# Altium PCB STM32H743I-EVAL2PCBDESIGN.PcbDoc (part 7 of 23)
Units mil, origin at the board's own origin, x right, y up, seen from the top; angles counter-clockwise.
Board outline 6558 x 5417 mil, 8 copper layers (L1_TOP, L2_GND, L3_HS1, L4_POWER, L5_SIG, L6_HS2, L7_GND, L8_BOTTOM), stack 61.368 mil thick; 620 components, 588 nets, 2945 pads, 1724 vias.
Unrouted connection lines stored in the file: 1.
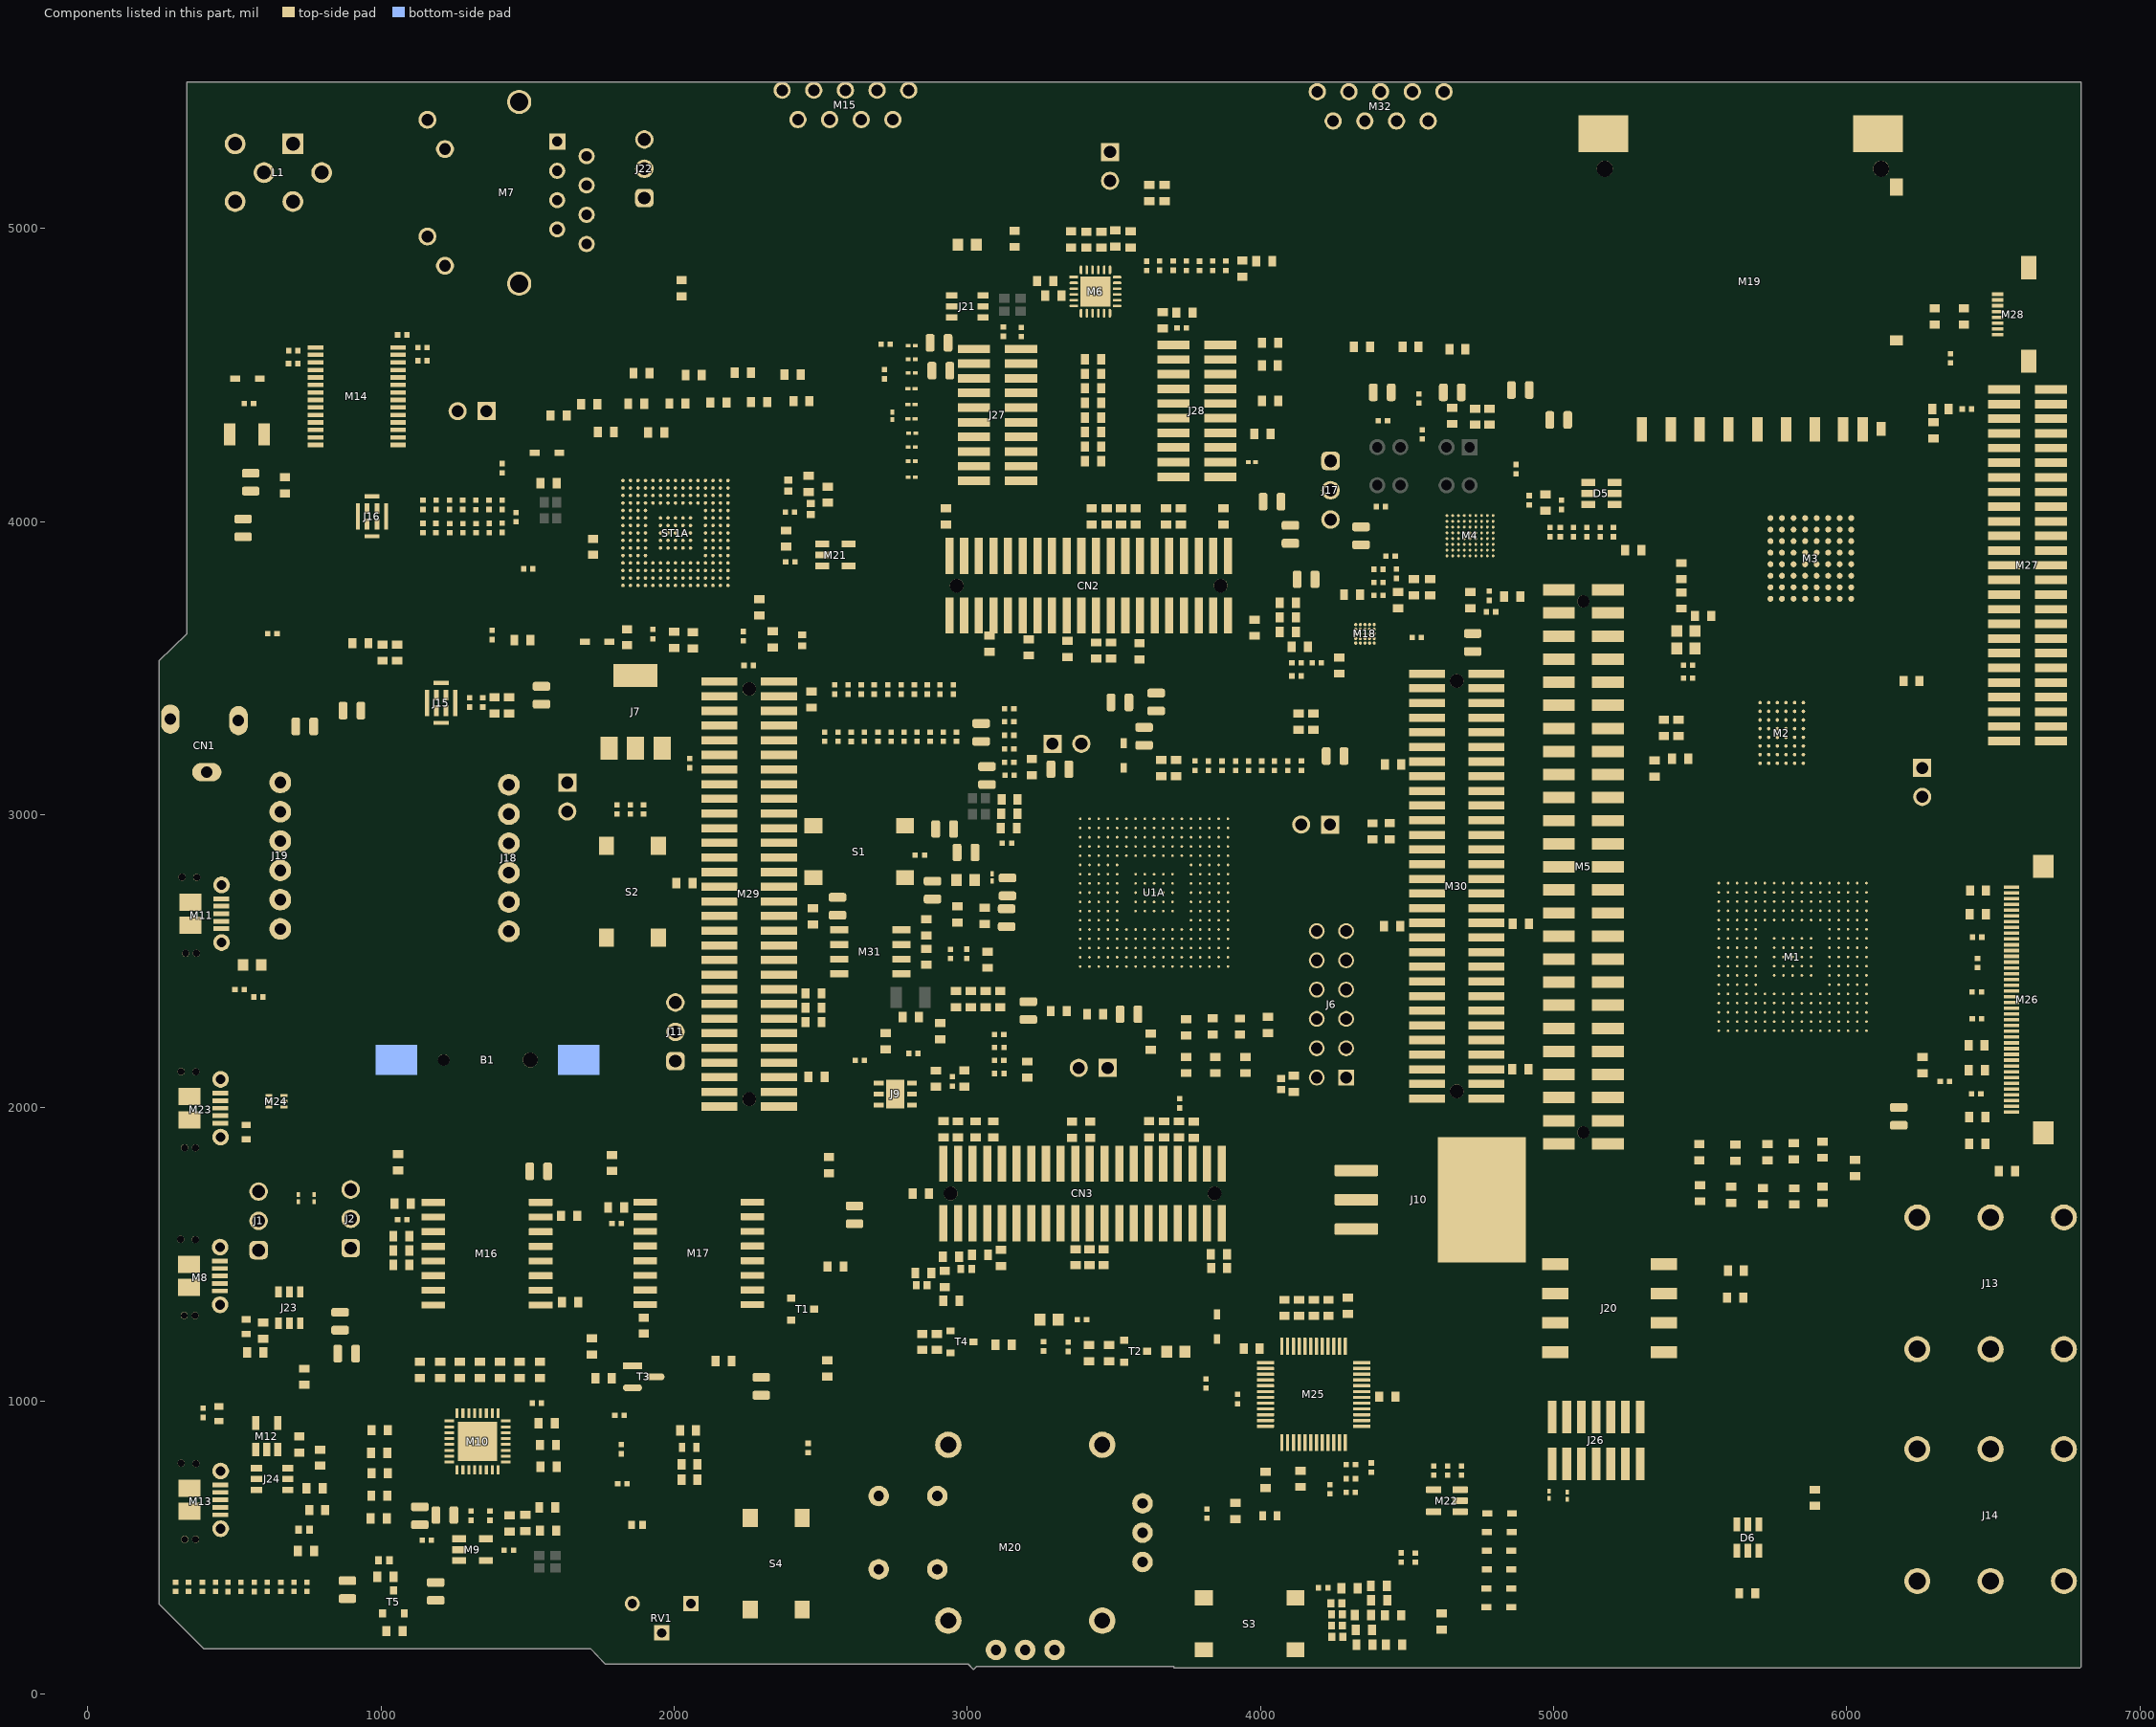
[diagram p8: the components of this part, seen from the top]

## Part data (continued)
M27: "CONN HEADER SMD 50POS 1.27MM / Connector Header Surface Mount 50 position 0.050\" (1.27mm)", Housing Color=Black, Manufacturer=Samtec, Manufacturer Lifecycle Status=PRODUCTION, Max Current Rating=1.75A, Max Operating Temperature=125°C, Min Operating Temperature=-55°C, Supplier Part Number=SAM9462-ND, Category="Headers and Wire Housings", ComponentLink1Description=https://sigma.octopart.com:443/97029548/technical_drawing/Samtec-FTSH-125-01-F-DV-K.pdf?src-supplier=Samtec, ComponentLink1URL=https://sigma.octopart.com:443/97029548/technical_drawing/Samtec-FTSH-125-01-F-DV-K.pdf?src-supplier=Samtec, ComponentLink2Description=https://datasheet.octopart.com:443/FTSH-125-01-F-DV-K-Samtec-datasheet-97029545.pdf?src-supplier=Samtec, ComponentLink2URL=https://datasheet.octopart.com:443/FTSH-125-01-F-DV-K-Samtec-datasheet-97029545.pdf?src-supplier=Samtec, ComponentLink3Description=https://datasheet.octopart.com:443/FTSH-125-01-F-DV-K-Samtec-datasheet-140825048.pdf?src-supplier=Electro+Sonic, ComponentLink3URL=https://datasheet.octopart.com:443/FTSH-125-01-F-DV-K-Samtec-datasheet-140825048.pdf?src-supplier=Electro+Sonic, ComponentLink4Description=https://datasheet.octopart.com:443/FTSH-125-01-F-DV-K-Samtec-datasheet-134102191.pdf?src-supplier=Electro+Sonic, ComponentLink4URL=https://datasheet.octopart.com:443/FTSH-125-01-F-DV-K-Samtec-datasheet-134102191.pdf?src-supplier=Electro+Sonic, ComponentLink5Description=https://datasheet.octopart.com:443/FTSH-125-01-F-DV-K-Samtec-datasheet-100454331.pdf?src-supplier=Newark, ComponentLink5URL=https://datasheet.octopart.com:443/FTSH-125-01-F-DV-K-Samtec-datasheet-100454331.pdf?src-supplier=Newark, ComponentLink6Description=https://datasheet.octopart.com:443/FTSH-125-01-F-DV-K-Samtec-datasheet-86818370.pdf?src-supplier=Sager+Electronics, ComponentLink6URL=https://datasheet.octopart.com:443/FTSH-125-01-F-DV-K-Samtec-datasheet-86818370.pdf?src-supplier=Sager+Electronics, ComponentLink7Description=https://datasheet.octopart.com:443/FTSH-125-01-F-DV-K-Samtec-datasheet-151470459.pdf?src-supplier=Sager+Electronics, ComponentLink7URL=https://datasheet.octopart.com:443/FTSH-125-01-F-DV-K-Samtec-datasheet-151470459.pdf?src-supplier=Sager+Electronics, ComponentLink8Description=https://datasheet.octopart.com:443/FTSH-125-01-F-DV-K-Samtec-datasheet-151470458.pdf?src-supplier=Sager+Electronics, ComponentLink8URL=https://datasheet.octopart.com:443/FTSH-125-01-F-DV-K-Samtec-datasheet-151470458.pdf?src-supplier=Sager+Electronics, ComponentLink9Description=https://datasheet.octopart.com:443/FTSH-125-01-F-DV-K-Samtec-datasheet-150877546.pdf?src-supplier=Sager+Electronics, ComponentLink9URL=https://datasheet.octopart.com:443/FTSH-125-01-F-DV-K-Samtec-datasheet-150877546.pdf?src-supplier=Sager+Electronics, ComponentLink10Description=https://datasheet.octopart.com:443/FTSH-125-01-F-DV-K-Samtec-datasheet-183475175.pdf?src-supplier=JRH+Electronics, ComponentLink10URL=https://datasheet.octopart.com:443/FTSH-125-01-F-DV-K-Samtec-datasheet-183475175.pdf?src-supplier=JRH+Electronics, ComponentLink11Description=https://datasheet.octopart.com:443/FTSH-125-01-F-DV-K-Samtec-datasheet-176663386.pdf?src-supplier=Toby+Electronics, ComponentLink11URL=https://datasheet.octopart.com:443/FTSH-125-01-F-DV-K-Samtec-datasheet-176663386.pdf?src-supplier=Toby+Electronics, ComponentLink12Description=https://datasheet.octopart.com:443/FTSH-125-01-F-DV-K-Samtec-datasheet-133497664.pdf?src-supplier=Toby+Electronics, ComponentLink12URL=https://datasheet.octopart.com:443/FTSH-125-01-F-DV-K-Samtec-datasheet-133497664.pdf?src-supplier=Toby+Electronics, ComponentLink13Description=https://datasheet.octopart.com:443/FTSH-125-01-F-DV-K-Samtec-datasheet-116535196.pdf?src-supplier=Toby+Electronics, ComponentLink13URL=https://datasheet.octopart.com:443/FTSH-125-01-F-DV-K-Samtec-datasheet-116535196.pdf?src-supplier=Toby+Electronics, ComponentLink14Description=https://datasheet.octopart.com:443/FTSH-125-01-F-DV-K-Samtec-datasheet-138897704.pdf?src-supplier=HQonline, ComponentLink14URL=https://datasheet.octopart.com:443/FTSH-125-01-F-DV-K-Samtec-datasheet-138897704.pdf?src-supplier=HQonline, Contact Material=Bronze, Contact Plating=Gold, Depth=3.43mm, Gender=Male, Housing Material=Polymer, Lead Free="Lead Free", Length=31.75mm, Lifecycle Status=Production, Manufacturer Part Number=FTSH-125-01-F-DV-K, Number of Contacts=50, Number of Rows=2, Orientation=Straight, Pitch=1.27mm, Pricing="1=5.71, 10=5.528, 25=5.35, 50=4.981, 100=4.113, 500=3.90376 (USD)", Radiation Hardening=No, RoHS=Compliant, Stock=154, Supplier=DigiKey, Termination=Solder
M28: "Molex 505110-0892 FFC & FPC Connectors, 0.5 FPC Zif Btm Cont Embt Pkg 8 Circuit,", Ambient Temperature Range High=105°C, Current Rating=500mA, Flammability Rating="UL94 V-0", Manufacturer=Molex, Manufacturer Lifecycle Status=ACTIVE, Min Operating Temperature=-40°C, Supplier Part Number=WM12364CT-ND, Voltage Rating=50V, Actuator Material="Glass, Nylon, Polyamide", Category="FFC / FPC", China RoHS=Compliant, ComponentLink1Description=https://sigma.octopart.com:443/165873393/technical_drawing/Molex-505110-0892.pdf?src-supplier=Upverter, ComponentLink1URL=https://sigma.octopart.com:443/165873393/technical_drawing/Molex-505110-0892.pdf?src-supplier=Upverter, ComponentLink2Description=https://datasheet.octopart.com:443/505110-0892-Molex-datasheet-165873386.pdf?src-supplier=Upverter, ComponentLink2URL=https://datasheet.octopart.com:443/505110-0892-Molex-datasheet-165873386.pdf?src-supplier=Upverter, ComponentLink3Description=https://datasheet.octopart.com:443/5051100892-Molex-datasheet-180775942.pdf?src-supplier=IHS, ComponentLink3URL=https://datasheet.octopart.com:443/5051100892-Molex-datasheet-180775942.pdf?src-supplier=IHS, ComponentLink4Description=https://datasheet.octopart.com:443/505110-0892-Molex-datasheet-193114841.pdf?src-supplier=JRH+Electronics, ComponentLink4URL=https://datasheet.octopart.com:443/505110-0892-Molex-datasheet-193114841.pdf?src-supplier=JRH+Electronics, ComponentLink5Description=https://datasheet.octopart.com:443/5051100892-Molex-datasheet-148171981.pdf?src-supplier=Molex, ComponentLink5URL=https://datasheet.octopart.com:443/5051100892-Molex-datasheet-148171981.pdf?src-supplier=Molex, ComponentLink6Description=https://datasheet.octopart.com:443/505110-0892-Molex-datasheet-77521067.pdf?src-supplier=element14+APAC, ComponentLink6URL=https://datasheet.octopart.com:443/505110-0892-Molex-datasheet-77521067.pdf?src-supplier=element14+APAC, ComponentLink7Description=https://datasheet.octopart.com:443/505110-0892-Molex-datasheet-62088043.pdf?src-supplier=Farnell, ComponentLink7URL=https://datasheet.octopart.com:443/505110-0892-Molex-datasheet-62088043.pdf?src-supplier=Farnell, ComponentLink8Description=https://datasheet.octopart.com:443/505110-0892-Molex-datasheet-140185858.pdf?src-supplier=RS+(Formerly+Allied+Electronics), ComponentLink8URL=https://datasheet.octopart.com:443/505110-0892-Molex-datasheet-140185858.pdf?src-supplier=RS+(Formerly+Allied+Electronics), ComponentLink9Description=https://datasheet.octopart.com:443/505110-0892-Molex-datasheet-120152440.pdf?src-supplier=RS+(Formerly+Allied+Electronics), ComponentLink9URL=https://datasheet.octopart.com:443/505110-0892-Molex-datasheet-120152440.pdf?src-supplier=RS+(Formerly+Allied+Electronics), ComponentLink10Description=https://datasheet.octopart.com:443/505110-0892-Molex-datasheet-61595454.pdf?src-supplier=RS+(Formerly+Allied+Electronics), ComponentLink10URL=https://datasheet.octopart.com:443/505110-0892-Molex-datasheet-61595454.pdf?src-supplier=RS+(Formerly+Allied+Electronics), ComponentLink11Description=https://datasheet.octopart.com:443/505110-0892-Molex-datasheet-134576216.pdf?src-supplier=TME, ComponentLink11URL=https://datasheet.octopart.com:443/505110-0892-Molex-datasheet-134576216.pdf?src-supplier=TME, ComponentLink12Description=http://sigma.octopart.com:80/reach_statement/Molex-company-74.pdf?src-supplier=Compliance+Statements, ComponentLink12URL=http://sigma.octopart.com:80/reach_statement/Molex-company-74.pdf?src-supplier=Compliance+Statements, ComponentLink13Description=http://sigma.octopart.com:80/rohs_statement/Molex-company-73.pdf?src-supplier=Compliance+Statements, ComponentLink13URL=http://sigma.octopart.com:80/rohs_statement/Molex-company-73.pdf?src-supplier=Compliance+Statements, ComponentLink14Description=http://sigma.octopart.com:80/conflict_mineral_statement/Molex-company-72.pdf?src-supplier=Compliance+Statements, ComponentLink14URL=http://sigma.octopart.com:80/conflict_mineral_statement/Molex-company-72.pdf?src-supplier=Compliance+Statements, Contact Material="Gold, Nickel", Contact Plating=Gold, Country of Origin=JP, Export Control Classification Number (ECCN) Code=EAR99, Gender=Female, Height=4.15mm, Introduction Date=2017-10-04, Lifecycle Status=Production, Manufacturer Part Number=505110-0892, Max Operating Temperature=105°C, Mounting Technology="Surface Mount", Number of Circuits=8, Number of Contacts=8, Number of Positions=8, Number of Rows=1, Orientation="Right Angle", Pins=8, Pitch=508µm, Plating=Gold, Pricing="1=0.68, 10=0.575, 25=0.5384, 50=0.5128, 100=0.4883, 250=0.45768, 500=0.4358, 1000=0.41498 (USD)", REACH SVHC=Yes, RoHS=Compliant, Schedule B=8536694040, Stock=8405, Supplier=DigiKey, Terminal Pitch=500µm, Termination=Solder
M29 M30: "Pin Header, Board-to-Board, 3.8 A, 2 Rows, 60 Contacts, Surface Mount, FTR Series, Unshrouded", Manufacturer=Samtec, Manufacturer Lifecycle Status=PRODUCTION, Supplier Part Number=FTR-130-03-L-D-LC-ND, Category="Board to Board Connectors", ComponentLink1Description=https://datasheet.octopart.com:443/FTR-130-03-L-D-LC-Samtec-datasheet-97028732.pdf?src-supplier=Samtec, ComponentLink1URL=https://datasheet.octopart.com:443/FTR-130-03-L-D-LC-Samtec-datasheet-97028732.pdf?src-supplier=Samtec, ComponentLink2Description=https://sigma.octopart.com:443/97028733/technical_drawing/Samtec-FTR-130-03-L-D-LC.pdf?src-supplier=Samtec, ComponentLink2URL=https://sigma.octopart.com:443/97028733/technical_drawing/Samtec-FTR-130-03-L-D-LC.pdf?src-supplier=Samtec, ComponentLink3Description=https://datasheet.octopart.com:443/FTR-130-03-L-D-LC-Samtec-datasheet-118235237.pdf?src-supplier=Electro+Sonic, ComponentLink3URL=https://datasheet.octopart.com:443/FTR-130-03-L-D-LC-Samtec-datasheet-118235237.pdf?src-supplier=Electro+Sonic, ComponentLink4Description=https://datasheet.octopart.com:443/FTR-130-03-L-D-LC-Samtec-datasheet-151312691.pdf?src-supplier=Sager+Electronics, ComponentLink4URL=https://datasheet.octopart.com:443/FTR-130-03-L-D-LC-Samtec-datasheet-151312691.pdf?src-supplier=Sager+Electronics, ComponentLink5Description=https://datasheet.octopart.com:443/FTR-130-03-L-D-LC-Samtec-datasheet-147834156.pdf?src-supplier=JRH+Electronics, ComponentLink5URL=https://datasheet.octopart.com:443/FTR-130-03-L-D-LC-Samtec-datasheet-147834156.pdf?src-supplier=JRH+Electronics, Lifecycle Status=Production, Manufacturer Part Number=FTR-130-03-L-D-LC, Pricing="15=11.85467 (USD)", RoHS=Compliant, Supplier=DigiKey
M31: "CAN 8Mbps Normal/Standby 2.5V/3.3V/5V Automotive AEC-Q100 8-Pin SOIC N T/R", Ambient Temperature Range High=150°C, Case/Package=SOIC, Manufacturer=Microchip, Manufacturer Lifecycle Status=REL, Manufacturer Package Identifier=C04-057-SN, Max Junction Temperature (Tj)=190°C, Max Supply Voltage=5.5V, Min Operating Temperature=-40°C, Min Supply Voltage=1.8V, Operating Supply Current=70mA, Supplier Part Number=150-MCP2562FDT-H/SNDKR-ND, Category="CAN Transceivers", ComponentLink1Description=https://datasheet.octopart.com:443/MCP2562FDT-H-SN-Microchip-datasheet-26699550.pdf?src-supplier=Microchip, ComponentLink1URL=https://datasheet.octopart.com:443/MCP2562FDT-H-SN-Microchip-datasheet-26699550.pdf?src-supplier=Microchip, ComponentLink2Description=https://datasheet.octopart.com:443/MCP2562FDT-H-SN-Microchip-datasheet-193545681.pdf?src-supplier=Microchip, ComponentLink2URL=https://datasheet.octopart.com:443/MCP2562FDT-H-SN-Microchip-datasheet-193545681.pdf?src-supplier=Microchip, ComponentLink3Description=https://sigma.octopart.com:443/164471516/technical_drawing/Microchip-MCP2562FDT-H-SN.pdf?src-supplier=Upverter, ComponentLink3URL=https://sigma.octopart.com:443/164471516/technical_drawing/Microchip-MCP2562FDT-H-SN.pdf?src-supplier=Upverter, ComponentLink4Description=http://sigma.octopart.com:80/188449173/materials_sheet/Microchip-MCP2562FDT-H-SN.pdf?src-supplier=Compliance+Statements, ComponentLink4URL=http://sigma.octopart.com:80/188449173/materials_sheet/Microchip-MCP2562FDT-H-SN.pdf?src-supplier=Compliance+Statements, ComponentLink5Description=http://sigma.octopart.com:80/190563418/materials_sheet/Microchip-MCP2562FDT-H-SN.pdf?src-supplier=Compliance+Statements, ComponentLink5URL=http://sigma.octopart.com:80/190563418/materials_sheet/Microchip-MCP2562FDT-H-SN.pdf?src-supplier=Compliance+Statements, ComponentLink6Description=http://sigma.octopart.com:80/rohs_statement/Microchip-company-71.pdf?src-supplier=Compliance+Statements, ComponentLink6URL=http://sigma.octopart.com:80/rohs_statement/Microchip-company-71.pdf?src-supplier=Compliance+Statements, ComponentLink7Description=http://sigma.octopart.com:80/reach_statement/Microchip-company-70.pdf?src-supplier=Compliance+Statements, ComponentLink7URL=http://sigma.octopart.com:80/reach_statement/Microchip-company-70.pdf?src-supplier=Compliance+Statements, ComponentLink8Description=http://sigma.octopart.com:80/conflict_mineral_statement/Microchip-company-69.pdf?src-supplier=Compliance+Statements, ComponentLink8URL=http://sigma.octopart.com:80/conflict_mineral_statement/Microchip-company-69.pdf?src-supplier=Compliance+Statements, ComponentLink9Description=http://sigma.octopart.com:80/conflict_mineral_statement/Microchip-company-68.pdf?src-supplier=Compliance+Statements, ComponentLink9URL=http://sigma.octopart.com:80/conflict_mineral_statement/Microchip-company-68.pdf?src-supplier=Compliance+Statements, Country of Assembly=Thailand, Country of Fabrication=Taiwan, Country of Origin=Thailand, Data Rate=8Mbps, Export Control Classification Number (ECCN) Code=EAR99, Harmonized Tariff Schedule (HTS) Code=8542.39.0060, Height=1.75mm, HS Code=8542.39.0090, Interface=CAN, Introduction Date=2014-03-24, Lifecycle Status=Production, Manufacturer Part Number=MCP2562FDT-H/SN, Max Operating Temperature=150°C, Mounting Technology="Surface Mount", Number of Channels=1, Number of Transceivers=1, Packaging="Tape & Reel (TR)", Pins=8, Pricing="1=1.38, 25=1.178 (USD)", Projected EOL Date=2039-03-24, Receiver Hysteresis=200mV, RoHS=Compliant, Schedule B="8529906000, 8529906000|8529906000|8529906000|8529906000|8529906000, 8542390000", Stock=6353, Supplier=DigiKey, Weight=540.001716mg
R1 R2 R139: library part RC0603FR-071K5L, "100mW Thick Film Resistors 75V ±100ppm/℃ ±1% 1.5kΩ 0603 Chip Resistor - Surface Mount ROHS", Case Code (Imperial)=0603, Manufacturer="Yageo Group", Max Operating Temperature=155°C, Max Power Dissipation=100mW, Min Operating Temperature=-55°C, Supplier Part Number=311-1.50KHRDKR-ND, Temperature Coefficient=100ppm/°C, Tolerance=1%, Voltage Rating=75V, Voltage Rating (AC)=50V, Case/Package=0603, Category="Chip SMD Resistors", China RoHS=Non-Compliant, ComponentLink1Description=https://datasheet.octopart.com:443/RC0603FR-071K5L-Yageo-datasheet-175887523.pdf?src-supplier=IHS, ComponentLink1URL=https://datasheet.octopart.com:443/RC0603FR-071K5L-Yageo-datasheet-175887523.pdf?src-supplier=IHS, ComponentLink2Description=https://datasheet.octopart.com:443/RC0603FR-071K5L-Yageo-datasheet-8328172.pdf?src-supplier=Newark, ComponentLink2URL=https://datasheet.octopart.com:443/RC0603FR-071K5L-Yageo-datasheet-8328172.pdf?src-supplier=Newark, ComponentLink3Description=https://datasheet.octopart.com:443/RC0603FR-071K5L-Yageo-datasheet-34211833.pdf?src-supplier=Newark, ComponentLink3URL=https://datasheet.octopart.com:443/RC0603FR-071K5L-Yageo-datasheet-34211833.pdf?src-supplier=Newark, ComponentLink4Description=https://datasheet.octopart.com:443/RC0603FR-071K5L-Yageo-datasheet-103092701.pdf?src-supplier=Upverter, ComponentLink4URL=https://datasheet.octopart.com:443/RC0603FR-071K5L-Yageo-datasheet-103092701.pdf?src-supplier=Upverter, ComponentLink5Description=https://datasheet.octopart.com:443/RC0603FR-071K5L-Yageo-Group-datasheet-190305687.pdf?src-supplier=Future+Electronics, ComponentLink5URL=https://datasheet.octopart.com:443/RC0603FR-071K5L-Yageo-Group-datasheet-190305687.pdf?src-supplier=Future+Electronics, ComponentLink6Description=https://datasheet.octopart.com:443/RC0603FR-071K5L-Yageo-datasheet-12596169.pdf?src-supplier=Future+Electronics, ComponentLink6URL=https://datasheet.octopart.com:443/RC0603FR-071K5L-Yageo-datasheet-12596169.pdf?src-supplier=Future+Electronics, ComponentLink7Description=https://datasheet.octopart.com:443/RC0603FR-071K5L-Yageo-datasheet-164759695.pdf?src-supplier=Future+Electronics, ComponentLink7URL=https://datasheet.octopart.com:443/RC0603FR-071K5L-Yageo-datasheet-164759695.pdf?src-supplier=Future+Electronics, ComponentLink8Description=https://datasheet.octopart.com:443/RC0603FR-071K5L-Yageo-datasheet-137700087.pdf?src-supplier=Future+Electronics, ComponentLink8URL=https://datasheet.octopart.com:443/RC0603FR-071K5L-Yageo-datasheet-137700087.pdf?src-supplier=Future+Electronics, ComponentLink9Description=https://datasheet.octopart.com:443/RC0603FR-071K5L-Yageo-datasheet-127823281.pdf?src-supplier=Future+Electronics, ComponentLink9URL=https://datasheet.octopart.com:443/RC0603FR-071K5L-Yageo-datasheet-127823281.pdf?src-supplier=Future+Electronics, ComponentLink10Description=https://datasheet.octopart.com:443/RC0603FR071K5L-Yageo-datasheet-27584510.pdf?src-supplier=Future+Electronics, ComponentLink10URL=https://datasheet.octopart.com:443/RC0603FR071K5L-Yageo-datasheet-27584510.pdf?src-supplier=Future+Electronics, ComponentLink11Description=https://datasheet.octopart.com:443/RC0603FR-071K5L-Yageo-datasheet-15599030.pdf?src-supplier=Future+Electronics, ComponentLink11URL=https://datasheet.octopart.com:443/RC0603FR-071K5L-Yageo-datasheet-15599030.pdf?src-supplier=Future+Electronics, ComponentLink12Description=https://datasheet.octopart.com:443/RC0603FR-071K5L-Yageo-datasheet-8324193.pdf?src-supplier=Future+Electronics, ComponentLink12URL=https://datasheet.octopart.com:443/RC0603FR-071K5L-Yageo-datasheet-8324193.pdf?src-supplier=Future+Electronics, ComponentLink13Description=https://datasheet.octopart.com:443/RC0603FR-071K5L-Yageo-datasheet-62067350.pdf?src-supplier=element14+APAC, ComponentLink13URL=https://datasheet.octopart.com:443/RC0603FR-071K5L-Yageo-datasheet-62067350.pdf?src-supplier=element14+APAC, ComponentLink14Description=https://datasheet.octopart.com:443/RC0603FR-071K5L-Yageo-Group-datasheet-189192902.pdf?src-supplier=LCSC, ComponentLink14URL=https://datasheet.octopart.com:443/RC0603FR-071K5L-Yageo-Group-datasheet-189192902.pdf?src-supplier=LCSC, ComponentLink15Description=https://datasheet.octopart.com:443/RC0603FR-071K5L-Yageo-datasheet-79472498.pdf?src-supplier=Megastar, ComponentLink15URL=https://datasheet.octopart.com:443/RC0603FR-071K5L-Yageo-datasheet-79472498.pdf?src-supplier=Megastar, ComponentLink16Description=https://datasheet.octopart.com/RC0603FR-071K5L-Yageo-datasheet-73766026.pdf, ComponentLink16URL=https://datasheet.octopart.com/RC0603FR-071K5L-Yageo-datasheet-73766026.pdf, ComponentLink17Description=https://datasheet.octopart.com:443/RC0603FR-071K5L-Yageo-datasheet-30459151.pdf?src-supplier=Seeed+Studio, ComponentLink17URL=https://datasheet.octopart.com:443/RC0603FR-071K5L-Yageo-datasheet-30459151.pdf?src-supplier=Seeed+Studio, ComponentLink18Description=https://datasheet.octopart.com:443/RC0603FR-071K5L-Yageo-datasheet-13691069.pdf?src-supplier=Farnell, ComponentLink18URL=https://datasheet.octopart.com:443/RC0603FR-071K5L-Yageo-datasheet-13691069.pdf?src-supplier=Farnell, ComponentLink19Description=https://datasheet.octopart.com:443/RC0603FR-071K5L-Yageo-datasheet-118562.pdf?src-supplier=DigiKey, ComponentLink19URL=https://datasheet.octopart.com:443/RC0603FR-071K5L-Yageo-datasheet-118562.pdf?src-supplier=DigiKey, ComponentLink20Description=http://sigma.octopart.com:80/conflict_mineral_statement/Yageo-company-3.pdf?src-supplier=Compliance+Statements, ComponentLink20URL=http://sigma.octopart.com:80/conflict_mineral_statement/Yageo-company-3.pdf?src-supplier=Compliance+Statements, ComponentLink21Description=http://sigma.octopart.com:80/rohs_statement/Yageo-company-2.pdf?src-supplier=Compliance+Statements, ComponentLink21URL=http://sigma.octopart.com:80/rohs_statement/Yageo-company-2.pdf?src-supplier=Compliance+Statements, Composition="Thick Film", Contact Plating=Tin, Depth=800µm, Features="Moisture Resistant", Height=450µm, Lead Free="Lead Free", Length=1.6mm, Lifecycle Status=Production, Manufacturer Part Number=RC0603FR-071K5L, Military Standard=Not, Mounting Technology="Surface Mount", Number of Terminals=2, Number of Terminations=2, Packaging="Tape & Reel", Pins=2, Power Rating=100mW, Pricing="1=0.11, 10=0.027, 25=0.0196, 50=0.0158, 100=0.0129, 250=0.00996, 500=0.0083, 1000=0.00701 (USD)", Radiation Hardening=No, REACH SVHC=Yes, RoHS=Compliant, Schedule B="8533210045, 8533210045|8533210045|8533210045|8533210045|8533210045|8533210045|8533210045|8533210045|8533210045|8533210045|8533210045|8533210045|8533210045|8533210045|8533210045|8533210045|8533210045|8533210045|8533210045|8533210045|8533210045|8533210045|8533210045|85", Stock=1165040, Supplier=DigiKey, Termination=SMD/SMT, Voltage Rating (DC)=50V, Width=800µm, Working Voltage=75V
R3 R4 R5 R23 R90 R93 R101 R103 R106 R107 R108 R109 R121 R123 R127 R128 R129 R136 R143 R145 R150 R175 R177 R185 R197 R198 R199 R200 R201 R202 R203 R205 R225 R232 R233 R239 R258 R259 R260 R265: library part RC0603FR-0710KL, "100mW Thick Film Resistors ±100ppm/℃ ±1% 10kΩ 0603 Chip Resistor - Surface Mount ROHS", Case Code (Imperial)=0603, Manufacturer="Yageo Group", Max Operating Temperature=155°C, Min Operating Temperature=-55°C, Power Rating=100mW, Supplier Part Number=311-10.0KHRDKR-ND, Temperature Coefficient=100ppm/°C, Tolerance=1%, Voltage Rating=75V, Voltage Rating (DC)=50V, Case Code (Metric)=0603, Case/Package=0603, Category="Chip SMD Resistors", China RoHS=Non-Compliant, ComponentLink1Description=https://datasheet.octopart.com:443/RC0603FR-0710KL-Yageo-datasheet-175887523.pdf?src-supplier=IHS, ComponentLink1URL=https://datasheet.octopart.com:443/RC0603FR-0710KL-Yageo-datasheet-175887523.pdf?src-supplier=IHS, ComponentLink2Description=https://datasheet.octopart.com:443/RC0603FR-0710KL-Yageo-datasheet-103092701.pdf?src-supplier=Upverter, ComponentLink2URL=https://datasheet.octopart.com:443/RC0603FR-0710KL-Yageo-datasheet-103092701.pdf?src-supplier=Upverter, ComponentLink3Description=https://datasheet.octopart.com:443/RC0603FR-0710KL-Yageo-datasheet-98239111.pdf?src-supplier=Upverter, ComponentLink3URL=https://datasheet.octopart.com:443/RC0603FR-0710KL-Yageo-datasheet-98239111.pdf?src-supplier=Upverter, ComponentLink4Description=https://datasheet.octopart.com:443/RC0603FR-0710KL-Yageo-datasheet-141265859.pdf?src-supplier=Upverter, ComponentLink4URL=https://datasheet.octopart.com:443/RC0603FR-0710KL-Yageo-datasheet-141265859.pdf?src-supplier=Upverter, ComponentLink5Description=https://sigma.octopart.com:443/138820526/technical_drawing/Yageo-RC0603FR-0710KL.pdf?src-supplier=Upverter, ComponentLink5URL=https://sigma.octopart.com:443/138820526/technical_drawing/Yageo-RC0603FR-0710KL.pdf?src-supplier=Upverter, ComponentLink6Description=https://datasheet.octopart.com:443/RC0603FR-0710KL-Yageo-datasheet-8328172.pdf?src-supplier=Farnell, ComponentLink6URL=https://datasheet.octopart.com:443/RC0603FR-0710KL-Yageo-datasheet-8328172.pdf?src-supplier=Farnell, ComponentLink7Description=https://datasheet.octopart.com:443/RC0603FR-0710KL-Yageo-datasheet-13691069.pdf?src-supplier=Farnell, ComponentLink7URL=https://datasheet.octopart.com:443/RC0603FR-0710KL-Yageo-datasheet-13691069.pdf?src-supplier=Farnell, ComponentLink8Description=https://datasheet.octopart.com:443/RC0603FR-0710KL-Yageo-datasheet-62067350.pdf?src-supplier=element14+APAC, ComponentLink8URL=https://datasheet.octopart.com:443/RC0603FR-0710KL-Yageo-datasheet-62067350.pdf?src-supplier=element14+APAC, ComponentLink9Description=https://datasheet.octopart.com:443/RC0603FR-0710KL-Yageo-datasheet-17842380.pdf?src-supplier=element14+APAC, ComponentLink9URL=https://datasheet.octopart.com:443/RC0603FR-0710KL-Yageo-datasheet-17842380.pdf?src-supplier=element14+APAC, ComponentLink10Description=https://datasheet.octopart.com:443/RC0603FR-0710KL-Yageo-datasheet-15599030.pdf?src-supplier=Future+Electronics, ComponentLink10URL=https://datasheet.octopart.com:443/RC0603FR-0710KL-Yageo-datasheet-15599030.pdf?src-supplier=Future+Electronics, ComponentLink11Description=https://datasheet.octopart.com:443/RC0603FR-0710KL-Yageo-Group-datasheet-176638170.pdf?src-supplier=Future+Electronics, ComponentLink11URL=https://datasheet.octopart.com:443/RC0603FR-0710KL-Yageo-Group-datasheet-176638170.pdf?src-supplier=Future+Electronics, ComponentLink12Description=https://datasheet.octopart.com:443/RC0603FR-0710KL-Yageo-datasheet-164759695.pdf?src-supplier=Future+Electronics, ComponentLink12URL=https://datasheet.octopart.com:443/RC0603FR-0710KL-Yageo-datasheet-164759695.pdf?src-supplier=Future+Electronics, ComponentLink13Description=https://datasheet.octopart.com:443/RC0603FR-0710KL-Yageo-datasheet-127823281.pdf?src-supplier=Future+Electronics, ComponentLink13URL=https://datasheet.octopart.com:443/RC0603FR-0710KL-Yageo-datasheet-127823281.pdf?src-supplier=Future+Electronics, ComponentLink14Description=https://datasheet.octopart.com:443/RC0603FR-0710KL-Yageo-datasheet-137700087.pdf?src-supplier=Future+Electronics, ComponentLink14URL=https://datasheet.octopart.com:443/RC0603FR-0710KL-Yageo-datasheet-137700087.pdf?src-supplier=Future+Electronics, ComponentLink15Description=https://datasheet.octopart.com:443/RC0603FR-0710KL-Yageo-datasheet-27584510.pdf?src-supplier=Future+Electronics, ComponentLink15URL=https://datasheet.octopart.com:443/RC0603FR-0710KL-Yageo-datasheet-27584510.pdf?src-supplier=Future+Electronics, ComponentLink16Description=https://datasheet.octopart.com:443/RC0603FR-0710KL-Yageo-datasheet-8324193.pdf?src-supplier=Future+Electronics, ComponentLink16URL=https://datasheet.octopart.com:443/RC0603FR-0710KL-Yageo-datasheet-8324193.pdf?src-supplier=Future+Electronics, ComponentLink17Description=https://datasheet.octopart.com:443/RC0603FR-0710KL-Yageo-datasheet-12596169.pdf?src-supplier=Newark, ComponentLink17URL=https://datasheet.octopart.com:443/RC0603FR-0710KL-Yageo-datasheet-12596169.pdf?src-supplier=Newark, ComponentLink18Description=https://datasheet.octopart.com:443/RC0603FR-0710KL-Yageo-datasheet-503470.pdf?src-supplier=Newark, ComponentLink18URL=https://datasheet.octopart.com:443/RC0603FR-0710KL-Yageo-datasheet-503470.pdf?src-supplier=Newark, ComponentLink19Description=https://datasheet.octopart.com:443/RC0603FR-0710KL-Yageo-datasheet-34211833.pdf?src-supplier=Newark, ComponentLink19URL=https://datasheet.octopart.com:443/RC0603FR-0710KL-Yageo-datasheet-34211833.pdf?src-supplier=Newark, ComponentLink20Description=https://datasheet.octopart.com:443/RC0603FR-0710KL-Yageo-Group-datasheet-189192902.pdf?src-supplier=LCSC, ComponentLink20URL=https://datasheet.octopart.com:443/RC0603FR-0710KL-Yageo-Group-datasheet-189192902.pdf?src-supplier=LCSC, ComponentLink21Description=https://datasheet.octopart.com:443/RC0603FR-0710KL-Yageo-datasheet-79472498.pdf?src-supplier=Megastar, ComponentLink21URL=https://datasheet.octopart.com:443/RC0603FR-0710KL-Yageo-datasheet-79472498.pdf?src-supplier=Megastar, ComponentLink22Description=https://datasheet.octopart.com/RC0603FR-0710KL-Yageo-datasheet-73766026.pdf, ComponentLink22URL=https://datasheet.octopart.com/RC0603FR-0710KL-Yageo-datasheet-73766026.pdf, ComponentLink23Description=https://datasheet.octopart.com:443/RC0603FR-0710KL-Yageo-datasheet-118562.pdf?src-supplier=DigiKey, ComponentLink23URL=https://datasheet.octopart.com:443/RC0603FR-0710KL-Yageo-datasheet-118562.pdf?src-supplier=DigiKey, ComponentLink24Description=http://sigma.octopart.com:80/conflict_mineral_statement/Yageo-company-3.pdf?src-supplier=Compliance+Statements, ComponentLink24URL=http://sigma.octopart.com:80/conflict_mineral_statement/Yageo-company-3.pdf?src-supplier=Compliance+Statements, ComponentLink25Description=http://sigma.octopart.com:80/rohs_statement/Yageo-company-2.pdf?src-supplier=Compliance+Statements, ComponentLink25URL=http://sigma.octopart.com:80/rohs_statement/Yageo-company-2.pdf?src-supplier=Compliance+Statements, Composition="Thick Film", Contact Plating=Tin, Depth=800µm, Height=450µm, Lead Free="Lead Free", Lead Pitch=300µm, Length=1.6mm, Lifecycle Status=Production, Manufacturer Part Number=RC0603FR-0710KL, Military Standard=Not, Mounting Technology="Surface Mount", Number of Terminals=2, Packaging="Tape & Reel", Pins=2, Pricing="1=0.1, 10=0.025, 25=0.0188, 50=0.015, 100=0.0122, 250=0.0094, 500=0.00782, 1000=0.00661 (USD)", Radiation Hardening=No, REACH SVHC=Yes, RoHS=Compliant, Schedule B="8533210045, 8533210045|8533210045|8533210045|8533210045|8533210045|8533210045|8533210045|8533210045|8533210045|8533210045|8533210045|8533210045|8533210045|8533210045|8533210045|8533210045|8533210045|8533210045|8533210045|8533210045|8533210045|8533210045|8533210045|85", Stock=778832, Supplier=DigiKey, Termination=SMD/SMT, Weight=2.012816mg, Width=800µm, Working Voltage=75V
R6 R7 R8 R9 R10 R11 R12 R13 R14 R15 R16 R17 R18 R19 R20 R21 R22 R24 R25 R26 R27 R28 R29 R30 R31 R32 R33 R35 R36 R38 R39 R40 R41 R42 R43 R44 R45 R46 R47 R48 R49 R50 R51 R52 R53 R54 R55 R56 R57 R58 R59 R60 R61 R62 R63 R64 R65 R66 R68 R69 R71 R73 R74 R75 R76 R77 R79 R80 R81 R83 R84 R85 R86 R87 R89 R92: library part RC0402JR-0733RL, "Res Thick Film 0402 33 Ohm 5% 0.063W(1/16W) ±100ppm/C Pad SMD T/R", Case Code (Imperial)=0402, Manufacturer="Yageo Group", Max Operating Temperature=155°C, Max Power Dissipation=63mW, Min Operating Temperature=-55°C, Power Rating=62.5mW, Supplier Part Number=311-33JRCT-ND, Temperature Coefficient=100ppm/°C, Tolerance=5%, Voltage Rating=50V, Case/Package=0402, Category="Chip SMD Resistors", China RoHS=Non-Compliant, ComponentLink1Description=https://datasheet.octopart.com:443/RC0402JR-0733RL-Yageo-datasheet-175887523.pdf?src-supplier=Newark, ComponentLink1URL=https://datasheet.octopart.com:443/RC0402JR-0733RL-Yageo-datasheet-175887523.pdf?src-supplier=Newark, ComponentLink2Description=https://datasheet.octopart.com:443/RC0402JR-0733RL-Yageo-datasheet-10408619.pdf?src-supplier=Newark, ComponentLink2URL=https://datasheet.octopart.com:443/RC0402JR-0733RL-Yageo-datasheet-10408619.pdf?src-supplier=Newark, ComponentLink3Description=https://datasheet.octopart.com:443/RC0402JR-0733RL-Yageo-datasheet-8324527.pdf?src-supplier=Newark, ComponentLink3URL=https://datasheet.octopart.com:443/RC0402JR-0733RL-Yageo-datasheet-8324527.pdf?src-supplier=Newark, ComponentLink4Description=https://datasheet.octopart.com:443/RC0402JR-0733RL-Yageo-datasheet-141265859.pdf?src-supplier=Upverter, ComponentLink4URL=https://datasheet.octopart.com:443/RC0402JR-0733RL-Yageo-datasheet-141265859.pdf?src-supplier=Upverter, ComponentLink5Description=https://sigma.octopart.com:443/138820526/technical_drawing/Yageo-RC0402JR-0733RL.pdf?src-supplier=Upverter, ComponentLink5URL=https://sigma.octopart.com:443/138820526/technical_drawing/Yageo-RC0402JR-0733RL.pdf?src-supplier=Upverter, ComponentLink6Description=https://datasheet.octopart.com:443/RC0402JR-0733RL-Yageo-datasheet-62067350.pdf?src-supplier=element14+APAC, ComponentLink6URL=https://datasheet.octopart.com:443/RC0402JR-0733RL-Yageo-datasheet-62067350.pdf?src-supplier=element14+APAC, ComponentLink7Description=https://datasheet.octopart.com:443/RC0402JR-0733RL-Yageo-Group-datasheet-189192902.pdf?src-supplier=LCSC, ComponentLink7URL=https://datasheet.octopart.com:443/RC0402JR-0733RL-Yageo-Group-datasheet-189192902.pdf?src-supplier=LCSC, ComponentLink8Description=https://datasheet.octopart.com:443/RC0402JR-0733RL-Yageo-Group-datasheet-176638170.pdf?src-supplier=Future+Electronics, ComponentLink8URL=https://datasheet.octopart.com:443/RC0402JR-0733RL-Yageo-Group-datasheet-176638170.pdf?src-supplier=Future+Electronics, ComponentLink9Description=https://datasheet.octopart.com:443/RC0402JR-0733RL-Yageo-datasheet-164759695.pdf?src-supplier=Future+Electronics, ComponentLink9URL=https://datasheet.octopart.com:443/RC0402JR-0733RL-Yageo-datasheet-164759695.pdf?src-supplier=Future+Electronics, ComponentLink10Description=https://datasheet.octopart.com:443/RC0402JR-0733RL-Yageo-datasheet-127823281.pdf?src-supplier=Future+Electronics, ComponentLink10URL=https://datasheet.octopart.com:443/RC0402JR-0733RL-Yageo-datasheet-127823281.pdf?src-supplier=Future+Electronics, ComponentLink11Description=https://datasheet.octopart.com:443/RC0402JR-0733RL-Yageo-datasheet-137700087.pdf?src-supplier=Future+Electronics, ComponentLink11URL=https://datasheet.octopart.com:443/RC0402JR-0733RL-Yageo-datasheet-137700087.pdf?src-supplier=Future+Electronics, ComponentLink12Description=https://datasheet.octopart.com:443/RC0402JR-0733RL-Yageo-datasheet-103092701.pdf?src-supplier=Future+Electronics, ComponentLink12URL=https://datasheet.octopart.com:443/RC0402JR-0733RL-Yageo-datasheet-103092701.pdf?src-supplier=Future+Electronics, ComponentLink13Description=https://datasheet.octopart.com:443/RC0402JR-0733RL-Yageo-datasheet-98239111.pdf?src-supplier=Future+Electronics, ComponentLink13URL=https://datasheet.octopart.com:443/RC0402JR-0733RL-Yageo-datasheet-98239111.pdf?src-supplier=Future+Electronics, ComponentLink14Description=https://datasheet.octopart.com:443/RC0402JR-0733RL-Yageo-datasheet-77992522.pdf?src-supplier=Future+Electronics, ComponentLink14URL=https://datasheet.octopart.com:443/RC0402JR-0733RL-Yageo-datasheet-77992522.pdf?src-supplier=Future+Electronics, ComponentLink15Description=https://datasheet.octopart.com:443/RC0402JR-0733RL-Yageo-datasheet-67302840.pdf?src-supplier=Future+Electronics, ComponentLink15URL=https://datasheet.octopart.com:443/RC0402JR-0733RL-Yageo-datasheet-67302840.pdf?src-supplier=Future+Electronics, ComponentLink16Description=https://datasheet.octopart.com:443/RC0402JR-0733RL-Yageo-datasheet-12531192.pdf?src-supplier=Future+Electronics, ComponentLink16URL=https://datasheet.octopart.com:443/RC0402JR-0733RL-Yageo-datasheet-12531192.pdf?src-supplier=Future+Electronics, ComponentLink17Description=https://datasheet.octopart.com:443/RC0402JR-0733RL-Yageo-datasheet-505231.pdf?src-supplier=Future+Electronics, ComponentLink17URL=https://datasheet.octopart.com:443/RC0402JR-0733RL-Yageo-datasheet-505231.pdf?src-supplier=Future+Electronics, ComponentLink18Description=https://datasheet.octopart.com/RC0402JR-0733RL-Yageo-datasheet-73766026.pdf, ComponentLink18URL=https://datasheet.octopart.com/RC0402JR-0733RL-Yageo-datasheet-73766026.pdf, ComponentLink19Description=https://datasheet.octopart.com:443/RC0402JR-0733RL-Yageo-datasheet-8329306.pdf?src-supplier=element14, ComponentLink19URL=https://datasheet.octopart.com:443/RC0402JR-0733RL-Yageo-datasheet-8329306.pdf?src-supplier=element14, ComponentLink20Description=http://sigma.octopart.com:80/conflict_mineral_statement/Yageo-company-3.pdf?src-supplier=Compliance+Statements, ComponentLink20URL=http://sigma.octopart.com:80/conflict_mineral_statement/Yageo-company-3.pdf?src-supplier=Compliance+Statements, ComponentLink21Description=http://sigma.octopart.com:80/rohs_statement/Yageo-company-2.pdf?src-supplier=Compliance+Statements, ComponentLink21URL=http://sigma.octopart.com:80/rohs_statement/Yageo-company-2.pdf?src-supplier=Compliance+Statements, Composition="Thick Film", Country of Origin="Mainland China, Taiwan", Depth=500µm, Export Control Classification Number (ECCN) Code=EAR99, Features="Moisture Resistant", Harmonized Tariff Schedule (HTS) Code=8533.21.00.30, Height=350µm, Introduction Date=2008-07-18, Lead Free="Lead Free", Length=1mm, Lifecycle Status=Production, Manufacturer Part Number=RC0402JR-0733RL, Military Standard=Not, Mounting Technology="Surface Mount", Number of Terminals=2, Number of Terminations=2, Packaging="Cut Tape", Pins=2, Pricing="1=0.1, 10=0.019, 25=0.0136, 50=0.0108, 100=0.0087, 250=0.0066, 500=0.00542, 1000=0.00451, 5000=0.00309 (USD)", REACH SVHC=Yes, RoHS=Compliant, Schedule B="8533210045, 8533210045|8533210045, 8533210045|8533210045|8533210045, 8533210045|8533210045|8533210045|8533210045", Stock=3589470, Supplier=DigiKey, Termination=SMD/SMT, Voltage Rating (AC)=50V, Voltage Rating (DC)=50V, Width=500µm, Working Voltage=50V
R34 R37 R67 R70 R72 R211: library part RC0603FR-07220KL, "Res Thick Film 0603 220K Ohm 1% 0.1W(1/10W) ±100ppm/C Pad SMD T/R", Case Code (Imperial)=0603, Manufacturer="Yageo Group", Max Operating Temperature=155°C, Max Power Dissipation=100mW, Min Operating Temperature=-55°C, Supplier Part Number=311-220KHRDKR-ND, Temperature Coefficient=100ppm/°C, Tolerance=1%, Voltage Rating=75V, Voltage Rating (AC)=50V, Case/Package=0603, Category="Chip SMD Resistors", China RoHS=Non-Compliant, ComponentLink1Description=https://datasheet.octopart.com:443/RC0603FR-07220KL-Yageo-datasheet-175887523.pdf?src-supplier=IHS, ComponentLink1URL=https://datasheet.octopart.com:443/RC0603FR-07220KL-Yageo-datasheet-175887523.pdf?src-supplier=IHS, ComponentLink2Description=https://datasheet.octopart.com:443/RC0603FR-07220KL-Yageo-datasheet-62067350.pdf?src-supplier=element14+APAC, ComponentLink2URL=https://datasheet.octopart.com:443/RC0603FR-07220KL-Yageo-datasheet-62067350.pdf?src-supplier=element14+APAC, ComponentLink3Description=https://datasheet.octopart.com:443/RC0603FR-07220KL-Yageo-datasheet-79472498.pdf?src-supplier=Upverter, ComponentLink3URL=https://datasheet.octopart.com:443/RC0603FR-07220KL-Yageo-datasheet-79472498.pdf?src-supplier=Upverter, ComponentLink4Description=https://datasheet.octopart.com:443/RC0603FR-07220KL-Yageo-datasheet-103092701.pdf?src-supplier=Upverter, ComponentLink4URL=https://datasheet.octopart.com:443/RC0603FR-07220KL-Yageo-datasheet-103092701.pdf?src-supplier=Upverter, ComponentLink5Description=https://datasheet.octopart.com:443/RC0603FR-07220KL-Yageo-datasheet-8328172.pdf?src-supplier=Newark, ComponentLink5URL=https://datasheet.octopart.com:443/RC0603FR-07220KL-Yageo-datasheet-8328172.pdf?src-supplier=Newark, ComponentLink6Description=https://datasheet.octopart.com:443/RC0603FR-07220KL-Yageo-datasheet-34211833.pdf?src-supplier=Newark, ComponentLink6URL=https://datasheet.octopart.com:443/RC0603FR-07220KL-Yageo-datasheet-34211833.pdf?src-supplier=Newark, ComponentLink7Description=https://datasheet.octopart.com:443/RC0603FR-07220KL-Yageo-datasheet-12596169.pdf?src-supplier=Future+Electronics, ComponentLink7URL=https://datasheet.octopart.com:443/RC0603FR-07220KL-Yageo-datasheet-12596169.pdf?src-supplier=Future+Electronics, ComponentLink8Description=https://datasheet.octopart.com:443/RC0603FR-07220KL-Yageo-Group-datasheet-176638170.pdf?src-supplier=Future+Electronics, ComponentLink8URL=https://datasheet.octopart.com:443/RC0603FR-07220KL-Yageo-Group-datasheet-176638170.pdf?src-supplier=Future+Electronics, ComponentLink9Description=https://datasheet.octopart.com:443/RC0603FR-07220KL-Yageo-datasheet-164759695.pdf?src-supplier=Future+Electronics, ComponentLink9URL=https://datasheet.octopart.com:443/RC0603FR-07220KL-Yageo-datasheet-164759695.pdf?src-supplier=Future+Electronics, ComponentLink10Description=https://datasheet.octopart.com:443/RC0603FR-07220KL-Yageo-datasheet-137700087.pdf?src-supplier=Future+Electronics, ComponentLink10URL=https://datasheet.octopart.com:443/RC0603FR-07220KL-Yageo-datasheet-137700087.pdf?src-supplier=Future+Electronics, ComponentLink11Description=https://datasheet.octopart.com:443/RC0603FR-07220KL-Yageo-datasheet-127823281.pdf?src-supplier=Future+Electronics, ComponentLink11URL=https://datasheet.octopart.com:443/RC0603FR-07220KL-Yageo-datasheet-127823281.pdf?src-supplier=Future+Electronics, ComponentLink12Description=https://datasheet.octopart.com:443/RC0603FR07220KL-Yageo-datasheet-27584510.pdf?src-supplier=Future+Electronics, ComponentLink12URL=https://datasheet.octopart.com:443/RC0603FR07220KL-Yageo-datasheet-27584510.pdf?src-supplier=Future+Electronics, ComponentLink13Description=https://datasheet.octopart.com:443/RC0603FR-07220KL-Yageo-datasheet-17842380.pdf?src-supplier=Future+Electronics, ComponentLink13URL=https://datasheet.octopart.com:443/RC0603FR-07220KL-Yageo-datasheet-17842380.pdf?src-supplier=Future+Electronics, ComponentLink14Description=https://datasheet.octopart.com:443/RC0603FR-07220KL-Yageo-datasheet-15599030.pdf?src-supplier=Future+Electronics, ComponentLink14URL=https://datasheet.octopart.com:443/RC0603FR-07220KL-Yageo-datasheet-15599030.pdf?src-supplier=Future+Electronics, ComponentLink15Description=https://datasheet.octopart.com:443/RC0603FR-07220KL-Yageo-Group-datasheet-189192902.pdf?src-supplier=LCSC, ComponentLink15URL=https://datasheet.octopart.com:443/RC0603FR-07220KL-Yageo-Group-datasheet-189192902.pdf?src-supplier=LCSC, ComponentLink16Description=https://datasheet.octopart.com/RC0603FR-07220KL-Yageo-datasheet-73766026.pdf, ComponentLink16URL=https://datasheet.octopart.com/RC0603FR-07220KL-Yageo-datasheet-73766026.pdf, ComponentLink17Description=https://datasheet.octopart.com:443/RC0603FR-07220KL-Yageo-datasheet-13691069.pdf?src-supplier=Farnell, ComponentLink17URL=https://datasheet.octopart.com:443/RC0603FR-07220KL-Yageo-datasheet-13691069.pdf?src-supplier=Farnell, ComponentLink18Description=https://datasheet.octopart.com:443/RC0603FR-07220KL-Yageo-datasheet-118562.pdf?src-supplier=DigiKey, ComponentLink18URL=https://datasheet.octopart.com:443/RC0603FR-07220KL-Yageo-datasheet-118562.pdf?src-supplier=DigiKey, ComponentLink19Description=http://sigma.octopart.com:80/conflict_mineral_statement/Yageo-company-3.pdf?src-supplier=Compliance+Statements, ComponentLink19URL=http://sigma.octopart.com:80/conflict_mineral_statement/Yageo-company-3.pdf?src-supplier=Compliance+Statements, ComponentLink20Description=http://sigma.octopart.com:80/rohs_statement/Yageo-company-2.pdf?src-supplier=Compliance+Statements, ComponentLink20URL=http://sigma.octopart.com:80/rohs_statement/Yageo-company-2.pdf?src-supplier=Compliance+Statements, Composition="Thick Film", Depth=800µm, Features="Moisture Resistant", Height=450µm, Lead Free="Lead Free", Length=1.6mm, Lifecycle Status=Production, Manufacturer Part Number=RC0603FR-07220KL, Mounting Technology="Surface Mount", Number of Terminals=2, Number of Terminations=2, Packaging="Tape & Reel", Pins=2, Power Rating=100mW, Pricing="1=0.1, 10=0.025, 25=0.0188, 50=0.015, 100=0.0122, 250=0.0094, 500=0.00782, 1000=0.00661 (USD)", REACH SVHC=Yes, RoHS=Compliant, Schedule B="8533210045, 8533210045|8533210045, 8533210045|8533210045|8533210045, 8533210045|8533210045|8533210045|8533210045", Stock=127250, Supplier=DigiKey, Termination=SMD/SMT, Voltage Rating (DC)=50V, Width=800µm, Working Voltage=75V